# Altium PCB DT10966_MOTOR_CONTROLLER.PcbDoc (part 5 of 8)
Units mm, origin at the board's own origin, x right, y up, seen from the top; angles counter-clockwise.
Board outline 300 x 19 mm, 10 copper layers (Top Layer, Layer 2 GND, Layer 3 SIG, Layer 4 GND, Layer 5 PWR, Layer 6 PWR, Layer 7 GND, Layer 8 SIG, Layer 9 GND, Bottom Layer), stack 2.418 mm thick; 745 components, 446 nets, 2132 pads, 1222 vias.
Unrouted connection lines stored in the file: 3.
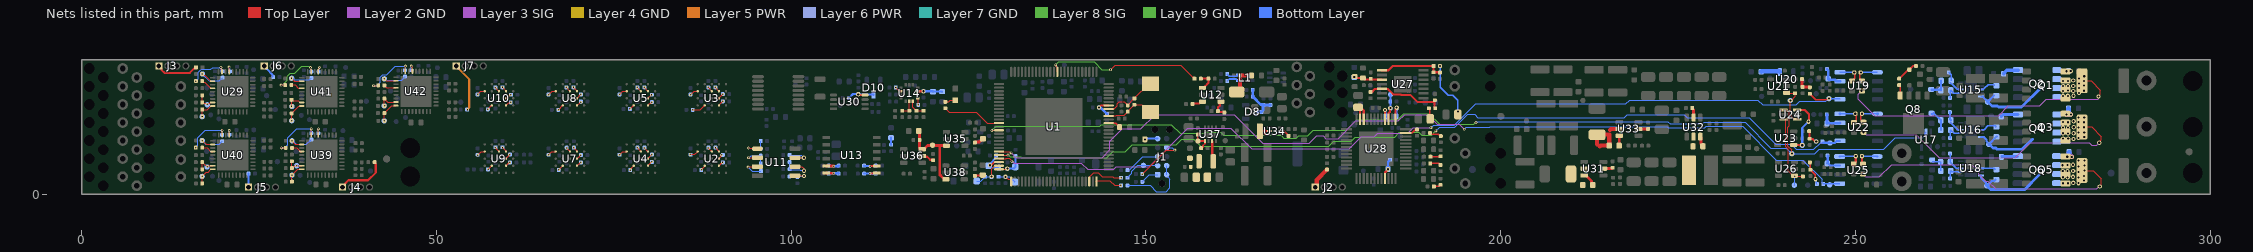
[diagram p12: the nets of this part, all layers, seen from the top]

## Via types
v1: diameter 0.6, hole 0.3, Top Layer to Bottom Layer, tented both sides, 726 vias
v2: diameter 0.4, hole 0.2, Top Layer to Bottom Layer, tented both sides, 493 vias
v3: diameter 0.5, hole 0.2, Top Layer to Bottom Layer, tented both sides, 3 vias

## Nets (pads, with @x,y where several pads share a name; then routed paths per layer and width w, separated by ;. In a path a pad name is that pad's centre, name@x,y a point inside that pad or via, vN(x,y) a via of type N, cw(c..) or ccw(c..) an arc to the next point about the centre after c; other vN are vias at no path point) (continued)
I_COMP: TP17.1 U1.14 U17.2 U24.4 | length 146.6
  Top Layer w0.15: v2(128.285,9.016) 128.295,9.027 129.276,9.027 U1.14@129.286,9.037 ; U24.4@239.843,11.889 240.243,11.889 240.657,11.475 240.657,9.674 240.445,9.462 240.445,6.801 240.98,6.266 240.98,5.774 v1(241.013,5.741)
  Layer 8 SIG w0.15: v2(128.285,9.016) 128.882,9.613 143.474,9.613 143.685,9.825 153.576,9.825 154.802,8.598 158.217,8.598 158.35,8.731 160.518,8.731 160.941,8.308 169.034,8.308 169.423,7.919 171.152,7.919 171.519,8.285 172.794,8.285 173.576,9.067 178.276,9.067 179.73,10.522 185.505,10.522 186.336,11.353 189.863,11.353 191.359,9.857 196.178,9.857 196.451,10.13 v2(196.506,10.13)
  Bottom Layer w0.15: v2(196.506,10.13) 196.573,10.13 196.701,10.257 223.51,10.257 223.844,9.923 228.49,9.923 228.699,10.133 234.435,10.133 238.068,6.501 240.253,6.501 v1(241.013,5.741) ; TP17.1@241.021,5.733 244.271,5.733 244.894,6.356 253.965,6.356 255.607,7.997 259.458,7.997 259.804,8.344 259.804,8.67 U17.2@259.929,8.795
I_COMP_A: R141.2 TP14.1 U21.1 U24.1 | length 5.9
  Top Layer w0.15: U21.1@240.274,14.303 240.299,14.278 241.445,14.278 R141.2@241.471,14.252 241.471,13.795 240.898,13.223 v1(240.796,13.223) 240.776,13.203 240.776,11.758 240.941,11.594 240.941,10.991 241.343,10.589 U24.1@241.743,10.589
I_COMP_B: R148.2 TP16.1 U23.1 U24.3 | length 7.9
  Top Layer w0.3: U23.1@241.275,6.969 241.278,6.966 242.469,6.966 R148.2@242.472,6.963 ; U24.3@241.743,11.889 242.84,11.889 243.438,11.291 243.438,10.418 243.345,10.325 v1(243.345,10.244)
  Bottom Layer w0.3: v1(242.472,6.913) 242.472,9.371 v1(243.345,10.244)
I_COMP_C: R156.2 TP20.1 U24.6 U26.1 | length 11.4
  Top Layer w0.15: U24.6@239.843,10.589 240.052,10.589 240.168,10.473 240.168,6.686 240.511,6.343 240.511,3.294 241.166,2.639 U26.1@241.366,2.639 v2(241.424,2.581) 242.504,2.581 R156.2@242.563,2.523
  Bottom Layer w0.15: TP20.1@241.366,1.296 241.395,1.325 241.395,2.552 v2(241.424,2.581)
IA: R146.1 TP10.1 U1.22 U19.5 | length 129.4
  Top Layer w0.15: U1.22@129.286,5.037 130.29,5.037 130.317,5.064 130.741,5.064 131.1,4.705 v2(131.1,4.654)
  Top Layer w0.2: R146.1@243.544,14.185 243.549,14.185 244.368,13.365 245.919,13.365 245.971,13.417 246.16,13.417 v1(246.236,13.494)
  Layer 3 SIG w0.127: v2(131.1,4.654) 131.153,4.654 131.403,4.404 140.909,4.404 141.776,3.537 145.461,3.537 145.827,3.903 150.44,3.903 155.87,9.333 161.971,9.333 164.888,6.416 178.614,6.416 180.317,8.119 182.134,8.119 182.64,8.624 186.898,8.624 187.658,9.384 v2(190.14,9.384)
  Bottom Layer w0.15: v2(190.14,9.384) 190.531,9.775 193.464,9.775 196.44,12.751 217.62,12.751 218.147,13.277 236.229,13.277 236.902,12.604 241.608,12.604 242.104,13.1 245.782,13.1 246.175,13.494 v1(246.236,13.494)
  Bottom Layer w0.2: v1(246.236,13.494) 246.285,13.445 247.738,13.445 U19.5@247.786,13.397
IB: R152.1 TP15.1 U1.21 U22.5 | length 125.1
  Top Layer w0.15: U1.21@129.286,5.537 v2(130.556,5.537)
  Layer 8 SIG w0.127: v2(130.556,5.537) 130.63,5.537 130.868,5.298 132.333,5.298 132.45,5.181 143.435,5.181 143.442,5.189 144.501,5.189 145.34,6.028 147.07,6.028 148.053,7.01 154.293,7.01 155.031,7.749 156.731,7.749 157.698,6.783 175.729,6.783 176.455,7.508 178.937,7.508 179.504,8.075 185.02,8.075 185.693,8.747 188.455,8.747 188.889,8.314 190.234,8.314 v2(190.858,8.937)
  Bottom Layer w0.127: v2(190.858,8.937) 191.361,9.44 193.504,9.44 195.327,11.262 196.311,11.262 196.764,10.809 217.402,10.809 217.786,11.193 225.88,11.193 226.278,10.795 234.372,10.795 234.387,10.81 235,10.81 238.767,7.043 240.943,7.043 241.639,6.348 244.118,6.348 245.05,7.279 245.392,7.279 R152.1@245.394,7.278
  Bottom Layer w0.3: R152.1@245.394,7.278 TP15.1@246.279,7.278 ; TP15.1@246.377,7.227 247.033,7.227 247.339,7.533 U22.5@247.799,7.533
IC: R159.1 TP19.1 U1.20 U25.5 | length 130.5
  Top Layer w0.127: U1.20@129.286,6.037 130.715,6.037 130.915,5.837 v2(130.989,5.837)
  Layer 3 SIG w0.127: v2(130.989,5.837) 131.677,5.149 142.872,5.149 142.883,5.159 143.815,5.159 144.918,6.263 144.918,7.481 146.656,9.219 149.268,9.219 151.28,11.231 162.429,11.231 166.421,7.239 173.035,7.239 174.046,8.251 174.953,8.251 175.362,7.841 177.066,7.841 179.567,10.342 185.571,10.342 186.477,11.248 189.697,11.248 191.044,9.901 194.13,9.901 v2(194.847,9.184)
  Bottom Layer w0.127: v2(194.847,9.184) 194.874,9.184 195.154,9.465 198.456,9.465 198.523,9.531 223.469,9.531 223.619,9.381 228.714,9.381 228.924,9.59 234.058,9.59 238.809,4.839 242.538,4.839 245.271,2.106 245.271,1.669 245.449,1.491 R159.1@245.47,1.491
  Bottom Layer w0.2: R159.1@245.437,1.458 245.47,1.491 246.396,1.491 247.723,1.491 U25.5@247.756,1.524
LED_Stat: R291.2 U1.12 | length 8.4
  Top Layer w0.15: R291.2@121.714,12.13 122.265,11.579 126.066,11.579 127.608,10.037 U1.12@129.286,10.037
NetC1_1: C1.1 R2.1 U1.66 Y1.1 | length 7
  Top Layer w0.127: U1.66@144.736,11.037 144.765,11.066 145.802,11.066 145.91,11.175 146.801,11.175 146.803,11.177 146.96,11.177 147.422,11.639 147.422,11.659 147.422,11.688 148.357,12.623 R2.1@148.357,12.627 149.397,12.627 150.437,11.587 Y1.1@150.637,11.587
NetC2_1: C2.1 R2.2 U1.68 Y1.2 | length 7.9
  Top Layer w0.127: U1.68@144.736,12.037 144.758,12.059 145.519,12.059 145.96,12.5 145.96,12.788 146.197,13.024 146.93,13.024 C2.1@147.422,12.533 ; C2.1@147.422,12.575 148.357,13.51 R2.2@148.357,13.527 148.377,13.527 150.437,15.587 Y1.2@150.637,15.587
NetC3_2: C3.2 R5.2 U1.69 | length 3
  Top Layer w0.3: v1(143.377,12.253) 143.406,12.253 143.691,12.537 U1.69@144.736,12.537
  Bottom Layer w0.4: v1(143.377,12.253) 143.377,12.233 143.437,12.173 143.669,12.173 144.424,11.417 144.424,11.412 144.499,11.337 R5.2@144.504,11.337 ; C3.2@143.389,12.221 C3.2@143.389,12.253
NetC4_2: C4.2 D1.2 R216.2 U1.25 | length 3.7
  Top Layer w0.15: U1.25@129.286,3.537 129.315,3.566 130.408,3.566 v1(130.464,3.622)
  Bottom Layer w0.3: v1(130.464,3.622) 131.326,3.622 131.635,3.931 R216.2@131.635,5.148
NetC5_2: C5.2 D2.2 R241.2 U1.24 | length 4.6
  Top Layer w0.15: v1(128.249,2.516) 128.249,3.618 128.594,3.962 128.595,3.962 128.67,4.037 U1.24@129.286,4.037
  Bottom Layer w0.15: D2.2@126.157,1.878 126.745,1.878 C5.2@127.334,2.467 ; C5.2@127.334,2.467 R241.2@128.249,2.466
NetC6_2: C6.2 D3.2 R275.2 U1.23 | length 4.8
  Top Layer w0.2: v1(128.026,4.105) 128.103,4.181 128.259,4.181 128.597,4.518 129.267,4.518 U1.23@129.286,4.537
  Bottom Layer w0.2: R275.2@128.904,5.499 R275.2@128.896,5.492 128.787,5.382 128.787,5.102 128.169,4.485 128.169,4.469 128.026,4.326 v1(128.026,4.105) 128.026,3.873 128.16,3.739 129.144,3.739 C6.2@129.286,3.597
NetC7_2: C7.2 D4.2 R277.2 U1.26 | length 3.8
  Top Layer w0.15: v1(130.2,2.469) 130.571,2.098 130.942,2.098 131.011,2.029 U1.26@131.011,1.812
  Bottom Layer w0.15: R277.2@129.207,2.477 129.211,2.473 130.196,2.473 v1(130.2,2.469) 130.795,2.469 131.511,1.753 D4.2@131.511,1.728
NetC64_2: C64.2 U14.8 | length 1
  Top Layer w0.15: U14.8@117.821,13.535 117.901,13.455 v2(117.901,12.612)
NetC65_2: C65.2 C66.2 FB10.1 U14.10 | length 3.5
  Top Layer w0.3: U14.10@117.821,14.535 117.825,14.531 118.647,14.531 v1(118.651,14.527)
  Bottom Layer w0.3: v1(118.651,14.527) 118.661,14.537 C66.2@119.967,14.537 ; C66.2@119.967,14.469 119.994,14.469 120.032,14.507 121.237,14.507 FB10.1@121.275,14.469
NetC70_1: C70.1 Q1.1 Q1.2 Q1.3 Q2.5 Q2.6 Q2.7 Q2.8 R129.1 R135.2 TP4.1 U15.5 | length 53.2
  Top Layer w0.15: R129.1@281.906,16.006 283.168,16.006 284.485,14.69 284.485,14.393 284.477,14.386 284.477,14.12 284.217,13.859 v1(284.217,13.807)
  Layer 3 SIG w0.15: v1(250.843,14.594) 250.378,14.128 250.378,13.378 252.661,11.095 270.156,11.095 271.526,12.466 275.979,12.466 276.895,13.382 284.114,13.382 284.228,13.495 284.228,13.796 v1(284.217,13.807)
  Bottom Layer w0.2: U15.5@267.65,13.774 U15.5@267.929,13.774
  Bottom Layer w0.3: U15.5@267.929,13.774 268.59,13.113 TP4.1@268.59,13.017 ; TP4.1@268.59,12.996 TP4.1@268.59,13.017 ; C70.1@269.512,13.91 269.483,13.91 TP4.1@268.59,13.017
  Bottom Layer w0.4: TP4.1@268.59,12.996 268.676,12.996 269.206,12.466 269.957,12.466 270.133,12.29 273.366,12.29 276.074,14.998
  other v1: 279.232,13.885 279.903,13.887 280.685,13.896 281.459,14.292 280.668,14.572 279.238,14.589 282.179,14.6 279.903,14.632 281.489,14.977 279.241,15.259 280.657,15.27 279.909,15.285 282.187,15.321 281.467,15.647 279.219,15.977 279.901,15.982 282.187,15.999 280.657,16.03 281.482,16.309 282.222,16.639
NetC70_2: C70.2 U15.3 | length 2.3
  Bottom Layer w0.2: U15.3@267.65,14.774 267.677,14.801 268.028,14.801 268.147,14.92 268.15,14.92 268.663,15.433 269.499,15.433 269.512,15.42 C70.2@269.512,15.31
NetC71_1: C71.1 C72.1 R77.1 | length 2.7
  Bottom Layer w0.3: R77.1@260.701,14.75 261.927,14.75 C72.1@262.008,14.67 262.025,14.687 262.025,15.99 C71.1@262.042,16.007
NetC71_2: C71.2 R117.2 U15.8 | length 3.3
  Bottom Layer w0.2: R117.2@263.12,17.204 263.442,16.883 C71.2@263.442,16.007 ; C71.2@263.362,15.798 263.317,15.753 263.473,15.596 263.544,15.596 264.339,14.801 264.778,14.801 U15.8@264.805,14.774
NetC72_2: C72.2 R115.2 U15.7 | length 2.7
  Bottom Layer w0.2: R115.2@263.31,13.525 263.359,13.573 263.359,14.621 C72.2@263.408,14.67 263.803,14.274 U15.7@264.805,14.274
NetC77_1: C77.1 Q3.1 Q3.2 Q3.3 Q4.5 Q4.6 Q4.7 Q4.8 R139.1 R144.2 TP5.1 U16.5 | length 50.5
  Top Layer w0.15: R139.1@281.906,9.506 283.253,9.506 284.634,8.125 284.634,7.713 284.326,7.405 v1(284.326,7.283)
  Layer 3 SIG w0.15: v1(251.13,8.747) 251.496,8.38 258.536,8.38 261.766,5.15 272.458,5.15 274.591,7.283 282.924,7.283 283.272,6.935 283.978,6.935 v1(284.326,7.283)
  Bottom Layer w0.3: U16.5@267.65,8.102 267.673,8.079 268.051,8.079 268.442,7.688 268.442,7.473 268.762,7.152 TP5.1@268.762,7.031 C77.1@269.902,8.171
  Bottom Layer w0.4: TP5.1@268.762,7.031 268.848,7.031 269.354,6.524 269.781,6.524 269.958,6.348 273.475,6.348 273.548,6.42 273.557,6.42 274.9,7.764
  other v1: 280.699,7.81 279.962,7.851 279.244,7.856 281.421,7.944 282.22,8.092 279.235,8.615 279.935,8.595 280.723,8.611 281.405,8.697 282.213,8.727 279.235,9.418 279.935,9.405 281.405,9.412 282.19,9.453 280.732,9.462 282.183,10.163 279.929,10.167 279.217,10.195 281.405,10.192 280.722,10.303 282.22,10.852 281.405,10.857
NetC77_2: C77.2 U16.3 | length 2.5
  Bottom Layer w0.2: U16.3@267.65,9.102 267.677,9.129 268.096,9.129 268.604,9.637 269.684,9.637 C77.2@269.827,9.494
NetC78_1: C78.1 C79.1 R286.1 | length 2.9
  Bottom Layer w0.3: R286.1@260.711,11.318 R286.1@260.787,11.242 ; R286.1@261.004,11.456 261.733,10.727 261.76,10.727 262.018,10.469 C78.1@262.018,10.442 ; C79.1@262.008,9.06 262.013,9.065 C78.1@262.013,10.437
NetC78_2: C78.2 R122.2 U16.8 | length 3.1
  Bottom Layer w0.2: C78.2@263.325,10.181 264.378,9.129 264.778,9.129 U16.8@264.805,9.102
  Bottom Layer w0.3: R122.2@263.272,11.585 263.298,11.56 263.298,10.562 C78.2@263.418,10.442
NetC79_2: C79.2 R120.2 U16.7 | length 2.8
  Bottom Layer w0.2: R120.2@263.301,7.925 263.354,7.978 263.354,9.006 C79.2@263.408,9.06 263.865,8.602 U16.7@264.805,8.602
NetC85_1: C85.1 Q5.1 Q5.2 Q5.3 Q6.5 Q6.6 Q6.7 Q6.8 R149.1 R155.2 TP7.1 U18.5 | length 52.5
  Top Layer w0.15: R149.1@281.906,3.364 R149.1@282.214,3.364 ; v1(282.228,3.349) R149.1@282.214,3.364 ; v1(284.392,1.112) 284.392,1.185 284.631,1.425 284.631,2.205 283.472,3.364 R149.1@282.214,3.364
  Layer 3 SIG w0.15: v1(251.031,2.877) 251.453,2.454 253.355,2.454 255.08,4.178 266.339,4.178 267.328,3.19 267.328,2.855 268.316,1.866 268.651,1.866 269.71,0.808 284,0.808 284.304,1.112 v1(284.392,1.112)
  Bottom Layer w0.3: U18.5@267.65,2.643 267.65,2.351 268.389,1.612 268.389,1.294 TP7.1@268.475,1.207 268.51,1.207 269.176,1.873 269.545,1.873 269.689,2.017 C85.1@269.689,2.06 ; 275.855,2.733 275.855,3.114
  Bottom Layer w0.4: TP7.1@268.503,1.207 269.01,0.701 273.823,0.701 275.855,2.733
  other v1: 279.224,1.563 279.908,1.56 281.406,1.576 280.663,1.621 282.19,1.937 281.405,2.365 279.203,2.404 279.878,2.403 280.643,2.465 282.205,2.594 281.405,3.169 279.176,3.291 279.849,3.296 280.65,3.295 281.405,3.953 282.228,4.09 279.163,4.105 279.839,4.13 280.643,4.172 281.405,4.776 282.225,4.756
NetC85_2: C85.2 U18.3 | length 2.1
  Bottom Layer w0.2: U18.3@267.65,3.666 267.665,3.651 269.499,3.651 C85.2@269.689,3.461
NetC86_1: C86.1 C87.1 R287.1 | length 2.5
  Bottom Layer w0.2: R287.1@260.782,4.571 C86.1@261.952,4.571 ; C86.1@261.961,4.58 261.985,4.557 261.985,3.332 C87.1@262.008,3.309
NetC86_2: C86.2 R127.2 U18.8 | length 3
  Bottom Layer w0.2: R127.2@263.301,5.741 263.331,5.711 263.331,4.61 C86.2@263.361,4.58 263.361,4.53 264.198,3.693 264.778,3.693 U18.8@264.805,3.666
NetC87_2: C87.2 R125.2 U18.7 | length 2.6
  Bottom Layer w0.2: R125.2@263.319,2.234 263.364,2.278 263.364,3.265 C87.2@263.408,3.309 263.55,3.166 U18.7@264.805,3.166
NetC91_1: C91.1 R135.1 U19.1 | length 3.8
  Top Layer w0.2: v1(250.747,17.172) 250.736,17.172 250.558,16.995 250.558,16.369 250.601,16.326 250.601,16.295 250.904,15.992 R135.1@250.916,15.992
  Bottom Layer w0.2: v1(250.747,17.172) 250.765,17.189 253.049,17.189 U19.1@253.066,17.207
NetC91_2: C91.2 R134.1 U19.8 | length 3.4
  Top Layer w0.2: R134.1@249.494,15.985 249.505,15.985 249.878,16.358 249.878,17.102 v1(249.807,17.172)
  Bottom Layer w0.2: U19.8@247.786,17.207 247.804,17.189 249.79,17.189 v1(249.807,17.172)
NetC93_2: C93.2 R136.2 U19.7 | length 3.3
  Bottom Layer w0.4: C93.2@245.952,17.676 245.952,17.656 246.134,17.474 R136.2@246.134,16.297 246.271,16.16 247.108,16.16 247.331,15.937 U19.7@247.786,15.937
NetC94_2: C94.2 FB11.2 U20.1 | length 2.7
  Bottom Layer w0.6: FB11.2@236.694,17.281 236.694,17.3 236.754,17.36 C94.2@237.918,17.36 ; C94.2@237.941,17.363 239.221,17.363 239.321,17.263 U20.1@239.321,17.233
NetC98_1: C98.1 R144.1 U22.1 | length 3.6
  Top Layer w0.2: v1(250.886,11.366) 250.747,11.227 250.747,10.539 250.815,10.472 250.815,10.46 251.118,10.157 R144.1@251.13,10.157
  Bottom Layer w0.2: v1@250.898,11.354 U22.1@253.068,11.354
  Bottom Layer w0.4: v1(250.886,11.366) v1@250.898,11.354 ; U22.1@253.068,11.354 U22.1@253.079,11.343
NetC98_2: C98.2 R143.1 U22.8 | length 3.6
  Top Layer w0.2: R143.1@249.782,10.137 249.794,10.137 250.097,10.441 250.097,10.499 250.113,10.515 250.113,11.199 v1(249.946,11.366)
  Bottom Layer w0.2: U22.8@247.811,11.354 v1@249.935,11.354
  Bottom Layer w0.4: U22.8@247.799,11.343 U22.8@247.811,11.354 ; v1@249.935,11.354 v1(249.946,11.366)
NetC100_2: C100.2 R145.1 R146.2 | length 2.2
  Top Layer w0.4: R145.1@242.448,16.243 242.448,15.194 242.508,15.133 C100.2@242.528,15.133 242.553,15.109 243.52,15.109 R146.2@243.544,15.085
NetC102_2: C102.2 R147.2 U22.7 | length 3.2
  Bottom Layer w0.4: C102.2@245.936,11.269 245.952,11.253 245.952,10.01 R147.2@245.969,9.993 246.008,10.033 247.76,10.033 U22.7@247.799,10.073
NetC105_2: C105.2 R151.1 R152.2 | length 2.1
  Top Layer w0.3: R151.1@243.45,8.898 243.49,8.858 243.49,7.882 243.592,7.78 243.967,7.78 v1@244.342,7.405
  other v1: 244.457,7.444
NetC107_1: C107.1 R155.1 U25.1 | length 3.3
  Top Layer w0.3: v1(250.889,5.382) 250.889,4.428 R155.1@251.043,4.274
  Bottom Layer w0.2: v1@250.913,5.358 U25.1@253.012,5.358
  Bottom Layer w0.3: v1(250.889,5.382) v1@250.913,5.358 ; U25.1@253.012,5.358 U25.1@253.036,5.334
NetC107_2: C107.2 R154.1 U25.8 | length 3.5
  Top Layer w0.3: R154.1@249.729,4.295 249.767,4.295 250.009,4.536 v1(250.009,5.382)
  Bottom Layer w0.2: U25.8@247.781,5.358 v1@249.985,5.358
  Bottom Layer w0.3: U25.8@247.756,5.334 U25.8@247.781,5.358 ; v1@249.985,5.358 v1(250.009,5.382)
NetC109_2: C109.2 R157.2 U25.7 | length 3
  Bottom Layer w0.3: R157.2@246.005,4.377 246.073,4.445 246.073,5.444 C109.2@246.043,5.475 ; R157.2@246.057,4.418 246.412,4.064 U25.7@247.756,4.064
NetC111_2: C111.2 R158.1 R159.2 | length 3.5
  Top Layer w0.2: R158.1@243.541,4.501 243.581,4.462 243.581,3.504 C111.2@243.62,3.465 243.624,3.465 244.34,2.749 v1(244.34,2.147)
  Bottom Layer w0.2: v1(244.34,2.147) 244.416,2.071 244.416,1.578 R159.2@244.537,1.458
NetC112_2: C112.2 R161.1 R162.2 U27.1 | length 9.4
  Top Layer w0.3: U27.1@183.222,17.47 183.25,17.498 184.17,17.498 184.758,18.086 R162.2@190.532,18.086 ; C112.2@190.517,17.202 190.525,17.209 190.525,18.078 R162.2@190.532,18.086 ; C112.2@190.525,17.21 191.413,17.21 R161.1@191.421,17.218 ; R162.2@190.529,18.088 R162.2@190.532,18.086
NetC114_1: C114.1 R162.1 | length 8
  Top Layer w0.2: v1(191.432,18.086) R162.1@191.58,18.234
  Bottom Layer w0.2: v1(191.432,18.086) 191.432,15.123 192.6,13.956 193.253,13.956 193.952,13.257 193.952,11.693 v1(193.94,11.681)
NetC115_1: C115.1 R164.1 | length 1.6
  Top Layer w0.2: R164.1@189.857,12.134 189.956,12.035 189.956,10.74 C115.1@190.056,10.64
NetC116_2: C116.2 R163.1 U28.45 | length 3
  Top Layer w0.3: U28.45@183.682,2.25 183.682,3.076 184.106,3.5 v1(184.106,3.542)
  Bottom Layer w0.3: R163.1@184.106,3.488 v1(184.106,3.542) R163.1@184.106,3.559 184.106,4.57 184.394,4.858 C116.2@184.394,4.878
NetC120_1: C120.1 U28.16 | length 2.3
  Top Layer w0.3: U28.16@183.682,10.59 183.682,11.898 v1(183.685,11.901)
  Bottom Layer w0.3: v1(183.685,11.901) 183.742,11.844 183.742,11.031 C120.1@183.831,10.943
NetC120_2: C120.2 R165.1 U28.13 | length 3
  Top Layer w0.3: U28.13@185.182,10.59 185.182,12.003 185.318,12.139 v1(185.318,12.22)
  Bottom Layer w0.3: C120.2@185.231,10.943 185.283,10.995 185.283,12.072 R165.1@185.335,12.124 185.318,12.141 v1(185.318,12.22)
NetC121_2: C121.2 R165.2 TP23.1 U28.15 | length 3.7
  Top Layer w0.3: U28.15@184.182,10.59 184.182,11.416 184.378,11.612 184.378,12.106 v1(184.435,12.163)
  Bottom Layer w0.3: v1(184.435,12.163) R165.2@184.435,12.124 C121.2@184.435,13.092 ; C121.2@184.435,13.092 184.45,13.107 184.45,14.059 TP23.1@184.465,14.074
NetC122_1: C122.1 R166.1 R169.1 R170.2 U27.3 | length 4
  Top Layer w0.3: v1(179.345,16.564) 179.525,16.384 180.641,16.384 180.856,16.17 181.67,16.17 U27.3@183.222,16.17
NetC123_2: C123.2 R164.2 R167.1 U27.5 | length 11.2
  Top Layer w0.3: R167.1@181.772,14.362 182.28,14.87 U27.5@183.222,14.87 183.25,14.842 184.072,14.842 184.829,14.086 185.856,14.086 185.92,14.022 187.243,14.022 188.236,13.029 190.46,13.029 190.687,13.256 C123.2@190.707,13.256 190.633,13.182 190.633,12.258 R164.2@190.757,12.134
NetC125_1: C125.1 U28.22 U28.23 | length 4.5
  Top Layer w0.3: C125.1@180.089,12.629 180.229,12.489 180.229,12.278 C125.1@180.55,11.956 ; U28.23@180.182,10.59 C125.1@180.182,11.844 ; C125.1@180.182,12.419 180.182,11.956 C125.1@180.182,11.844 ; U28.22@180.682,10.59 180.682,11.825 C125.1@180.55,11.956 ; C125.1@180.182,11.844 180.294,11.956 C125.1@180.55,11.956
NetC126_2: C126.2 U28.11 | length 1.8
  Top Layer w0.2: U28.11@186.602,8.67 186.629,8.697 187.534,8.697 187.842,9.005 188.065,9.005 C126.2@188.198,9.137
NetC127_1: C127.1 R177.1 | length 1
  Top Layer w0.2: R177.1@190.585,1.17 191.305,1.17 191.472,1.338 C127.1@191.509,1.338
NetC128_1: C128.1 R179.1 | length 1.5
  Top Layer w0.2: R179.1@190.058,4.354 191.264,4.354 191.472,4.145 C128.1@191.509,4.145
NetC138_1: C138.1 R184.1 | length 1.5
  Top Layer w0.15: R184.1@190.042,5.216 R184.1@190.111,5.285 ; C138.1@191.444,5.285 C138.1@191.513,5.354
  Top Layer w0.2: R184.1@190.111,5.285 C138.1@191.444,5.285
NetC139_1: C139.1 R185.1 | length 1.6
  Top Layer w0.2: R185.1@190.014,8.506 191.218,8.506 191.504,8.219 C139.1@191.54,8.219
NetC141_2: C141.2 R190.2 TP31.1 U29.18 | length 2.7
  Top Layer w0.15: C141.2@17,10.958 17.005,10.963 R190.2@17.005,11.953 ; R190.2@17.01,11.958 17.699,11.958 18.19,12.449 U29.18@18.47,12.449
  other v2: 16.988,10.969
NetC142_2: C142.2 R192.2 TP32.1 U29.17 | length 2.7
  Top Layer w0.15: R192.2@17.01,13.958 17.005,13.953 17.005,12.963 C142.2@17,12.958 17.113,12.844 17.485,12.844 17.63,12.698 v2(17.698,12.698) 17.746,12.746 17.988,12.746 18.19,12.949 U29.17@18.47,12.949
NetC143_1: C143.1 U29.13 | length 1.9
  Top Layer w0.15: C143.1@17,15.958 17.171,15.787 17.392,15.787 18.23,14.949 U29.13@18.47,14.949
NetC143_2: C143.2 R196.1 U29.8 | length 6.1
  Top Layer w0.15: v2(19.642,17.877) 19.689,17.83 19.689,17.658 19.795,17.553 U29.8@19.795,17.274
  Bottom Layer w0.15: v2(16.12,15.958) 16.464,16.302 16.464,17.197 16.802,17.535 16.825,17.535 16.918,17.627 18.222,17.627 18.472,17.877 v2(19.642,17.877) 19.642,17.81 19.721,17.73 19.721,17.514 R196.1@19.888,17.347
NetC144_2: C144.2 R196.2 TP35.1 U29.11 | length 5.4
  Top Layer w0.15: v2(17,16.958) 17.171,16.787 17.377,16.787 18.215,15.949 U29.11@18.47,15.949
  Bottom Layer w0.15: v2(17,16.958) TP35.1@17.041,16.958 18.004,15.995 19.436,15.995 R196.2@19.888,16.447
NetC145_2: C145.2 U29.6 | length 1.3
  Top Layer w0.15: U29.6@20.795,17.274 v2(20.795,17.936)
  Bottom Layer w0.15: v2(20.795,17.936) 20.795,17.868 20.903,17.76 C145.2@20.903,17.327
NetC151_2: C151.2 D10.3 R198.2 U30.8 | length 4.7
  Top Layer w0.3: v1(109.456,14.097) 109.537,14.097 109.61,14.024 110.397,14.024 U30.8@110.413,14.009
  Bottom Layer w0.3: R198.2@108.138,13.572 108.138,13.577 108.263,13.702 108.268,13.702 108.707,14.142 109.412,14.142 v1(109.456,14.097) 109.465,14.088 111.552,14.088 D10.3@111.605,14.035
NetC155_2: C155.2 D5.2 FB14.2 | length 4.2
  Top Layer w0.6: D5.2@162.79,14.425 163.23,14.865 C155.2@163.23,16.773 163.254,16.749 FB14.2@164.88,16.749
NetC156_2: C156.2 D8.3 R204.1 R205.1 R206.2 | length 5.3
  Bottom Layer w0.4: R206.2@165.049,14.727 165.053,14.724 165.053,13.769 C156.2@165.056,13.766 165.056,13.746 165.116,13.686 165.136,13.686 166.135,12.687 166.474,12.687 R205.1@166.549,12.612 ; D8.3@166.043,11.612 166.293,11.612 166.504,11.824 166.504,12.568 R205.1@166.549,12.612 ; R204.1@167.543,12.612 R205.1@166.549,12.612
NetC159_1: C159.1 L2.1 U31.5
NetC159_2: C159.2 U31.6 | length 2
  Top Layer w0.4: U31.6@211.752,2.674 212.002,2.674 212.777,1.898 212.777,1.503 C159.2@212.962,1.318
NetC160_1: C160.1 L3.1 U32.5
NetC160_2: C160.2 U32.6 | length 1.5
  Top Layer w0.4: U32.6@228.115,8.137 228.215,8.037 228.215,7.087 228.479,6.823 C160.2@228.479,6.773
NetC173_1: C173.1 L4.1 U33.5 | length 7.4
  Top Layer w0.6: 213.562,7.053 L4.1@213.562,8.393 213.619,8.451 215.323,8.451 215.265,8.393 C173.1@215.265,6.873 214.015,6.873 213.941,6.799 ; 215.392,9.083 215.523,9.214 U33.5@216.698,9.214
NetC173_2: C173.2 U33.6 | length 1.4
  Top Layer w0.4: C173.2@216.665,6.873 216.681,6.889 216.681,8.247 U33.6@216.698,8.264
NetC188_2: C188.2 R224.1 | length 1.3
  Top Layer w0.4: R224.1@125.896,7.302 125.971,7.377 126.506,7.377 126.97,7.841 C188.2@127.02,7.841
NetC193_2: C193.2 C194.2 C195.2 FB15.1 L6.2 R222.2 R226.2 TP47.1 U37.5 | length 3.1
  Top Layer w0.25: R226.2@157.272,8.444 157.303,8.413 157.303,7.552 TP47.1@157.335,7.521 U37.5@158.335,7.521 U37.5@158.32,7.506 ; R222.2@157.885,6.521 158.027,6.663 158.027,6.882 158.32,7.175
  Top Layer w0.3: 158.32,7.175 U37.5@158.32,7.506
NetC197_2: C197.2 U36.5 | length 2
  Top Layer w0.15: C197.2@120.002,4.801 C197.2@120.064,4.864
  Top Layer w0.3: U36.5@118.459,5.409 118.559,5.308 119.156,5.308 119.582,4.882 120.051,4.882 C197.2@120.132,4.801
NetC198_2: C198.2 C199.2 TP46.1 U35.3 U36.6 U38.3 | length 11.9
  Top Layer w0.4: C199.2@117.979,8.923 118.098,8.803 C198.2@118.098,7.688 ; C198.2@118.098,7.668 118.098,6.719 118.109,6.709 118.109,6.459 118.209,6.359 U36.6@118.459,6.359 118.709,6.359 119.216,6.866 119.857,6.866 TP46.1@119.924,6.933 119.969,6.888 120.933,6.888 121.844,6.888 U35.3@121.888,6.843 ; 120.888,6.888 120.933,6.843 120.933,2.767 121.248,2.452 121.265,2.452 121.494,2.224 121.697,2.224 U38.3@121.802,2.119
NetC201_2: C201.2 R228.1 | length 1.2
  Top Layer w0.3: R228.1@125.889,2.602 125.951,2.664 126.938,2.664 C201.2@127,2.726
NetC203_2: C203.2 R232.2 TP52.1 U39.18 | length 2.7
  Top Layer w0.15: C203.2@29.653,1.781 29.646,1.788 29.646,2.695 v2(29.657,2.705) 29.65,2.712 R232.2@29.638,2.712 30.464,3.537 U39.18@31.037,3.537
NetC204_2: C204.2 R234.2 TP53.1 U39.17 | length 2.5
  Top Layer w0.15: R234.2@29.638,4.667 29.646,4.66 29.646,3.697 C204.2@29.653,3.69 29.663,3.69 30.011,4.037 U39.17@31.037,4.037
  other v2: 30.306,4.037
NetC205_1: C205.1 U39.13 | length 1.6
  Top Layer w0.15: C205.1@29.653,6.555 30.306,6.555 30.737,6.124 30.737,6.107 30.806,6.037 U39.13@31.037,6.037
NetC205_2: C205.2 R238.1 U39.8 | length 7.9
  Top Layer w0.15: v2(28.166,6.541) 28.173,6.548 28.767,6.548 C205.2@28.773,6.555 ; U39.8@32.362,8.362 v2(32.362,9.229)
  Bottom Layer w0.15: v2(28.166,6.541) 28.568,6.541 29.054,7.026 29.054,7.959 30.324,9.229 v2(32.362,9.229) 32.371,9.22 32.371,8.639 R238.1@32.38,8.63
NetC206_2: C206.2 R238.2 TP56.1 U39.11 | length 4.8
  Top Layer w0.15: v2(29.653,7.555) 29.653,7.535 30.151,7.037 U39.11@31.037,7.037
  Bottom Layer w0.15: v2(29.653,7.555) 29.752,7.555 30.272,7.034 31.68,7.034 32.375,7.73 R238.2@32.38,7.73
NetC207_2: C207.2 U39.6 | length 1.5
  Top Layer w0.15: U39.6@33.362,8.362 33.371,8.371 33.371,9.221 v2(33.379,9.229)
  Bottom Layer w0.15: C207.2@33.369,8.626 33.374,8.631 33.374,9.224 v2(33.379,9.229)
NetC213_2: C213.2 R247.2 TP63.1 U40.18 | length 2.9
  Top Layer w0.15: C213.2@16.998,1.533 17.003,1.538 17.003,2.528 v2(17.008,2.533) 17.592,3.117 17.821,3.117 18.241,3.537 U40.18@18.496,3.537
NetC214_2: C214.2 R249.2 TP64.1 U40.17 | length 2.8
  Top Layer w0.15: R249.2@17.008,3.533 17.003,3.538 17.003,4.508 17.003,4.528 C214.2@16.998,4.533 16.998,4.527 17.574,3.951 17.667,3.951 v2(17.715,3.904) 17.782,3.904 17.916,4.037 U40.17@18.496,4.037
NetC215_1: C215.1 U40.13 | length 1.7
  Top Layer w0.15: C215.1@16.991,6.584 17.68,6.584 18.227,6.037 U40.13@18.496,6.037
NetC215_2: C215.2 R253.1 U40.8 | length 6.6
  Top Layer w0.15: v2(19.803,9.01) 19.812,9 19.812,8.372 U40.8@19.821,8.362
  Bottom Layer w0.15: v2(16.111,6.584) 16.111,6.605 16.401,6.895 16.401,7.984 17.431,9.014 19.798,9.014 19.809,9.004 19.809,8.39 R253.1@19.82,8.38
NetC216_2: C216.2 R253.2 TP67.1 U40.11 | length 5
  Top Layer w0.15: C216.2@16.996,7.573 v2(17.006,7.584) ; C216.2@16.996,7.589 17.001,7.584 17.004,7.581 17.547,7.037 U40.11@18.496,7.037
  Bottom Layer w0.15: v2(17.006,7.584) 17.006,7.578 17.53,7.055 19.39,7.055 19.815,7.48 R253.2@19.82,7.48
NetC217_2: C217.2 U40.6 | length 1
  Top Layer w0.15: U40.6@20.821,8.362 20.836,8.377 20.836,8.775
  Bottom Layer w0.15: v2(20.824,8.986) 20.836,8.975 20.836,8.426 C217.2@20.848,8.415
NetC223_2: C223.2 R257.2 TP73.1 U41.18 | length 2.9
  Top Layer w0.15: C223.2@29.59,10.43 29.596,10.436 29.596,11.421 30.609,12.434 31.022,12.434 U41.18@31.037,12.449
  other v2: 29.61,10.379
NetC224_2: C224.2 R259.2 TP74.1 U41.17 | length 2.5
  Top Layer w0.15: U41.17@31.037,12.949 30.758,12.949 30.535,13.172 29.746,13.172 R259.2@29.59,13.328 29.591,13.327 v2(29.591,12.414) ; v2(29.591,12.414) C224.2@29.593,12.412 v2(29.591,12.414)
NetC225_1: C225.1 U41.13 | length 1.7
  Top Layer w0.15: C225.1@29.578,15.458 29.602,15.434 30.082,15.434 30.567,14.949 U41.13@31.037,14.949
NetC225_2: C225.2 R263.1 U41.8 | length 7.6
  Top Layer w0.15: v2(28.123,15.4) 28.153,15.43 28.653,15.43 C225.2@28.689,15.467 ; v2(32.261,17.868) 32.309,17.82 32.309,17.606 32.362,17.553 U41.8@32.362,17.274
  Layer 8 SIG w0.15: v2(28.123,15.4) 28.16,15.437 28.387,15.437 29.017,16.068 29.017,16.636 29.436,17.055 30.034,17.055 31.057,18.077 32.048,18.077 32.257,17.868 v2(32.261,17.868) v2@32.309,17.82
  Bottom Layer w0.15: v2(32.261,17.868) 32.276,17.854 32.276,17.399 R263.1@32.381,17.294
NetC226_2: C226.2 R263.2 TP77.1 U41.11 | length 4.6
  Top Layer w0.15: C226.2@29.598,16.351 29.598,16.296 29.744,16.15 29.8,16.15 30.001,15.949 U41.11@31.037,15.949
  Bottom Layer w0.15: v2(29.585,16.351) 29.598,16.351 TP77.1@29.61,16.363 29.767,16.363 29.998,16.132 32.088,16.132 32.35,16.394 R263.2@32.381,16.394
NetC227_2: C227.2 U41.6 | length 1.2
  Top Layer w0.15: U41.6@33.362,17.274 33.362,17.553 33.497,17.688 33.497,17.842 v2(33.545,17.89)
  Bottom Layer w0.15: C227.2@33.41,17.484 33.494,17.484 33.497,17.487 33.497,17.842 v2(33.545,17.89)
NetC233_2: C233.2 R267.2 TP83.1 U42.18 | length 3.2
  Top Layer w0.15: v2(42.683,10.367) 42.675,10.374 42.675,11.441 R267.2@42.668,11.449 43.734,12.515 U42.18@44.305,12.515
NetC234_2: C234.2 R269.2 TP84.1 U42.17 | length 2.9
  Top Layer w0.15: R269.2@42.668,12.469 42.675,12.476 42.675,13.481 C234.2@42.683,13.488 42.683,13.468 43.136,13.015 U42.17@44.305,13.015
  other v2: 42.718,12.469
NetC235_1: C235.1 U42.13 | length 1.7
  Top Layer w0.15: C235.1@42.683,15.32 42.693,15.32 42.998,15.015 U42.13@44.305,15.015
NetC235_2: C235.2 R273.1 U42.8 | length 7.8
  Top Layer w0.15: v2(41.165,15.295) 41.177,15.307 41.79,15.307 C235.2@41.803,15.32 ; U42.8@45.63,17.34 45.633,17.342 45.633,18.069 v2(45.635,18.072)
  Bottom Layer w0.15: v2(41.165,15.295) 41.586,15.295 42.085,15.794 42.085,15.926 42.093,15.934 42.093,16.514 42.431,16.852 43.01,16.852 44.23,18.072 v2(45.635,18.072) ; R273.1@45.583,17.487 45.633,17.536 45.633,17.862
NetC236_2: C236.2 R273.2 TP87.1 U42.11 | length 4.9
  Top Layer w0.15: v2(42.67,16.275) 42.68,16.275 42.94,16.015 U42.11@44.305,16.015
  Bottom Layer w0.15: v2(42.67,16.275) 42.832,16.275 42.994,16.113 45.105,16.113 45.578,16.587 R273.2@45.583,16.587
NetC237_2: C237.2 U42.6 | length 1.4
  Top Layer w0.15: v2(46.462,18.066) 46.462,18.031 46.63,17.863 U42.6@46.63,17.34
  Bottom Layer w0.15: v2(46.462,18.066) 46.464,18.064 46.464,17.487 C237.2@46.466,17.485
NetD7_2: D7.2 R208.1 R209.2 | length 3.2
  Top Layer w0.2: R208.1@256.141,16.301 256.146,16.301 257.243,17.398 257.399,17.398 257.968,17.967 258.114,18.113 258.563,18.113 R209.2@258.572,18.122
NetD9_1: D9.1 R291.1 | length 1.5
  Top Layer w0.15: R291.1@121.714,13.03 121.767,13.083 122.219,13.083 122.399,13.262 D9.1@123.137,13.262
NetFB4_2: FB4.2 J1.5 | length 1.8
  Bottom Layer w0.3: v1(149.843,7.755) 149.924,7.755 150.026,7.857 J1.5@151.637,7.857
NetFB8_2: FB8.2 R95.1 | length 1
  Bottom Layer w0.3: R95.1@114.092,6.999 FB8.2@114.092,7.975
NetJ1_1: J1.1 R294.1 | length 2.6
  Bottom Layer w0.15: R294.1@149.478,1.774 150.482,2.777 J1.1@151.637,2.777
NetJ1_2: J1.2 R3.1 TP3.1 | length 4.8
  Bottom Layer w0.15: R3.1@147.383,2.343 147.986,2.945 147.986,3.267 148.806,4.087 TP3.1@149.637,4.087 151.203,4.087 151.243,4.047
NetJ1_3: J1.3 R292.1 | length 4.4
  Bottom Layer w0.15: R292.1@147.623,3.387 149.553,5.317 151.243,5.317
NetJ1_7: J1.7 R293.1 | length 7.3
  Top Layer w0.15: v2(149.495,2.826) 149.495,2.847 152.881,6.234 v2(154.069,6.234)
  Bottom Layer w0.15: J1.7@152.907,6.587 153.68,6.587 154.033,6.234 v2(154.069,6.234)
NetJ1_9: J1.9 J1.10 R1.1 | length 9.6
  Bottom Layer w0.15: R1.1@147.394,1.256 150.617,1.256 151.475,0.397 152.859,0.397 153.381,0.92 153.381,2.119 153.102,2.398 153.102,2.41 153.012,2.5 J1.10@153,2.5 ; J1.10@152.907,2.777 J1.9@152.907,4.047
NetJ2_1: J2.1 R71.1 | length 3.2
  Top Layer w0.6: J2.1@173.85,1.015 174.055,1.22 174.055,2.038 R71.1@175.503,3.487
NetJ3_1: J3.1 R72.1 | length 6.1
  Top Layer w0.3: J3.1@10.895,18.1 11.25,17.745 11.25,17.574 11.695,17.129 15.258,17.129 15.905,17.776 16.01,17.776 16.135,17.901 R72.1@16.135,17.906
NetJ4_1: J4.1 R73.1 | length 7.1
  Top Layer w0.3: J4.1@36.776,1.015 37.131,1.37 37.131,1.518 37.598,1.986 40.374,1.986 41.451,3.063 41.451,4.224 41.421,4.255 41.421,4.405 R73.1@41.296,4.53
NetJ5_1: J5.1 R74.1 | length 1.9
  Bottom Layer w0.3: J5.1@23.533,1.015 R74.1@23.533,2.92
NetJ6_1: J6.1 R78.1 | length 1.9
  Bottom Layer w0.3: J6.1@25.74,18.048 25.792,18.048 26.095,17.745 26.095,17.693 26.887,16.901 R78.1@26.887,16.629
NetJ7_1: J7.1 R89.1 | length 7
  Layer 5 PWR w0.3: J7.1@52.847,18.048 53.15,17.745 53.15,17.693 54.636,16.207 54.636,12.217 54.383,11.965 v2(54.383,11.938)
NetL1_2: L1.2 R203.1 | length 1.9
  Bottom Layer w0.25: R203.1@161.449,15.973 161.451,15.973 161.731,16.254 162.686,16.254 162.9,16.04 L1.2@163.15,16.04
NetL1_3: L1.3 R202.1 | length 1.9
  Bottom Layer w0.25: R202.1@161.451,16.908 161.452,16.908 161.721,16.639 162.699,16.639 162.9,16.84 L1.3@163.15,16.84
NetL5_1: L5.1 U34.2 | length 2.1
  Top Layer w0.3: L5.1@166.054,8.895 166.067,8.908 166.959,8.908 ; 166.742,8.546 166.742,8.691 166.959,8.908 ; 166.742,9.125 166.959,8.908 ; U34.2@167.377,8.908 166.959,8.908
NetL6_1: L6.1 U37.7 | length 2.8
  Top Layer w0.3: U37.7@159.334,7.421 159.334,4.811 L6.1@159.481,4.663
NetQ1_4: Q1.4 R116.2 | length 5.7
  Top Layer w0.3: Q1.4@279.559,17.307 279.606,17.355 v1(279.702,17.355)
  Layer 2 GND w0.3: v1(279.702,17.355) 279.708,17.361 280.304,17.361 v1(280.31,17.367)
  Layer 9 GND w0.3: v1(279.702,17.355) 279.708,17.361 280.304,17.361 v1(280.31,17.367)
  Layer 5 PWR w0.3: v1(279.702,17.355) 279.708,17.361 280.304,17.361 v1(280.31,17.367)
  Layer 6 PWR w0.3: v1(279.702,17.355) 279.708,17.361 280.304,17.361 v1(280.31,17.367)
  Layer 4 GND w0.3: v1(279.702,17.355) 279.708,17.361 280.304,17.361 v1(280.31,17.367)
  Layer 7 GND w0.3: v1(279.702,17.355) 279.708,17.361 280.304,17.361 v1(280.31,17.367)
  Layer 3 SIG w0.3: v1(279.702,17.355) 279.708,17.361 280.304,17.361 v1(280.31,17.367)
  Layer 8 SIG w0.3: v1(279.702,17.355) 279.708,17.361 280.304,17.361 v1(280.31,17.367)
  Bottom Layer w0.3: v1(279.702,17.355) 279.708,17.361 280.304,17.361 v1(280.31,17.367)
NetQ2_4: Q2.4 R118.2 | length 2.3
  Bottom Layer w0.5: R118.2@270.849,16.999 270.849,17.038 271.318,17.507 Q2.4@272.877,17.507
NetQ3_4: Q3.4 R121.2 | length 8.1
  Top Layer w0.6: v1(279.726,11.244) 279.74,11.258 v1(280.333,11.258)
  Layer 2 GND w0.6: v1(279.726,11.244) 279.74,11.258 v1(280.333,11.258)
  Layer 9 GND w0.6: v1(279.726,11.244) 280.319,11.244 v1(280.333,11.258)
  Layer 5 PWR w0.6: v1(279.726,11.244) 280.319,11.244 v1(280.333,11.258)
  Layer 6 PWR w0.6: v1(279.726,11.244) 280.319,11.244 v1(280.333,11.258)
  Layer 4 GND w0.6: v1(279.726,11.244) 279.74,11.258 v1(280.333,11.258)
  Layer 7 GND w0.6: v1(279.726,11.244) 279.74,11.258 v1(280.333,11.258)
  Layer 3 SIG w0.6: v1(279.726,11.244) 279.74,11.258 v1(280.333,11.258)
  Layer 8 SIG w0.6: v1(279.726,11.244) 280.319,11.244 v1(280.333,11.258)
  Bottom Layer w0.6: v1(279.726,11.244) v1@279.74,11.258 ; v1@279.74,11.258 279.936,11.454 279.936,12.07 R121.2@279.996,12.13 280.056,12.07 280.056,11.535 v1(280.333,11.258) v1@279.74,11.258
NetQ4_4: Q4.4 R123.2 | length 2.5
  Bottom Layer w0.4: R123.2@270.522,10.955 270.522,11.01 270.682,11.17 270.737,11.17 270.804,11.237 Q4.4@272.877,11.237
NetQ5_4: Q5.4 R126.2 | length 8.2
  Top Layer w0.3: Q5.4@279.559,5.347 279.77,5.347 v1(279.824,5.293)
  Top Layer w0.6: v1(279.824,5.293) 279.836,5.281 v1(280.453,5.281)
  Layer 2 GND w0.6: v1(279.824,5.293) 280.441,5.293 v1(280.453,5.281)
  Layer 9 GND w0.6: v1(279.824,5.293) 280.441,5.293 v1(280.453,5.281)
  Layer 5 PWR w0.6: v1(279.824,5.293) 280.441,5.293 v1(280.453,5.281)
  Layer 6 PWR w0.6: v1(279.824,5.293) 280.441,5.293 v1(280.453,5.281)
  Layer 4 GND w0.6: v1(279.824,5.293) 280.441,5.293 v1(280.453,5.281)
  Layer 7 GND w0.6: v1(279.824,5.293) 280.441,5.293 v1(280.453,5.281)
  Layer 3 SIG w0.6: v1(279.824,5.293) 280.441,5.293 v1(280.453,5.281)
  Layer 8 SIG w0.6: v1(279.824,5.293) 280.441,5.293 v1(280.453,5.281)
  Bottom Layer w0.6: R126.2@280.06,5.982 R126.2@280.12,5.922 ; v1(280.453,5.281) 280.144,5.281 ; R126.2@280.12,5.922 280.055,5.922 280,5.867 280,5.469 v1(279.824,5.293) 279.836,5.281 280.144,5.281 ; R126.2@280.12,5.922 280.12,5.305 280.144,5.281
NetQ6_4: Q6.4 R128.2 | length 2.3
  Bottom Layer w0.2: R128.2@270.548,5.292 R128.2@270.592,5.336 ; Q6.4@272.814,5.336 Q6.4@272.858,5.381
  Bottom Layer w0.4: R128.2@270.592,5.336 Q6.4@272.814,5.336
NetQ8_4: Q8.4 R208.2 | length 1.5
  Top Layer w0.2: R208.2@256.141,15.401 256.146,15.401 256.263,15.285 Q8.4@256.263,13.933
NetR1_2: R1.2 U1.50 | length 3.8
  Top Layer w0.15: U1.50@143.011,1.812 143.011,1.849 143.08,1.918 144.911,1.918 145.573,1.256 v2(146.444,1.256)
NetR3_2: R3.2 U1.48 | length 5.6
  Top Layer w0.15: U1.48@142.011,1.812 142.011,2.387 142.649,3.025 143.284,3.025 143.812,2.497 145.334,2.497 145.489,2.343 146.473,2.343 v2(146.483,2.332)
NetR4_1: R4.1 U1.64 | length 1.8
  Top Layer w0.2: U1.64@144.736,10.037 144.755,10.018 145.756,10.018 146.29,9.485 R4.1@146.29,9.473
NetR6_2: R6.2 U31.2 | length 1.4
  Top Layer w0.4: U31.2@214.452,3.624 215.636,3.624 215.762,3.749 R6.2@215.767,3.749
NetR7_2: R7.2 U32.2 | length 1.4
  Top Layer w0.4: R7.2@226.972,12.161 226.972,12.156 227.165,11.962 U32.2@227.165,10.837
NetR8_2: R8.2 U33.2 | length 1.4
  Top Layer w0.4: U33.2@219.398,9.214 219.401,9.217 220.754,9.217 R8.2@220.757,9.22
NetR9_2: R9.2 U34.5 | length 1.4
  Top Layer w0.25: U34.5@168.927,8.908 168.952,8.883 169.462,8.883 170.09,8.256 R9.2@170.09,8.251
NetR11_1: R11.1 U2.A4 | length 1.2
  Top Layer w0.15: v2(85.77,5.64) 86.423,5.64 U2.A4@86.821,6.038
NetR12_1: R12.1 U2.D4 | length 0.7
  Top Layer w0.15: v2(89.341,6.587) 89.341,6.553 89.821,6.073 U2.D4@89.821,6.038
NetR13_1: R13.1 U2.C4 | length 0.7
  Top Layer w0.15: v2(88.341,6.537) 88.341,6.528 88.821,6.048 U2.C4@88.821,6.038
NetR15_1: R15.1 U3.A4 | length 1.2
  Top Layer w0.15: v2(85.821,14.037) 86.321,14.537 U3.A4@86.821,14.537
NetR16_1: R16.1 U3.D4 | length 0.8
  Top Layer w0.15: v2(89.321,15.087) 89.321,15.062 89.821,14.562 U3.D4@89.821,14.537
NetR17_1: R17.1 U3.C4 | length 0.8
  Top Layer w0.15: v2(88.321,15.087) 88.321,15.062 88.821,14.562 U3.C4@88.821,14.537
NetR18_2: R18.2 U2.B2 | length 0.7
  Top Layer w0.15: v2(87.375,3.497) 87.375,3.544 87.821,3.99 U2.B2@87.821,4.038
NetR19_2: R19.2 U3.B2 | length 1.9
  Top Layer w0.15: v2(86.129,11.917) 87.201,11.917 U3.B2@87.821,12.537
NetR20_2: R20.2 U2.D3 | length 0.7
  Top Layer w0.15: U2.D3@89.821,5.038 90.154,5.371 90.154,5.516 v2(90.202,5.564)
NetR21_2: R21.2 U3.D3 | length 0.8
  Top Layer w0.15: U3.D3@89.821,13.537 89.821,13.55 90.371,14.1 v2(90.371,14.112)
NetR22_2: R22.2 U2.D2 | length 0.7
  Top Layer w0.15: U2.D2@89.821,4.038 89.844,4.038 90.304,4.498 v2(90.327,4.498)
NetR23_2: R23.2 U3.D2 | length 0.8
  Top Layer w0.15: U3.D2@89.821,12.537 89.821,12.55 90.371,13.1 v2(90.371,13.112)
NetR25_1: R25.1 U4.A4 | length 1.2
  Top Layer w0.15: v2(75.821,5.587) 76.271,6.037 U4.A4@76.821,6.037
NetR26_1: R26.1 U4.D4 | length 0.7
  Top Layer w0.15: v2(79.321,6.537) U4.D4@79.821,6.037
NetR27_1: R27.1 U4.C4 | length 0.8
  Top Layer w0.15: v2(78.321,6.587) 78.321,6.562 78.821,6.062 U4.C4@78.821,6.037
NetR29_1: R29.1 U5.A4 | length 1.2
  Top Layer w0.15: v2(75.821,14.087) 76.271,14.537 U5.A4@76.821,14.537
NetR30_1: R30.1 U5.D4 | length 0.8
  Top Layer w0.15: v2(79.321,15.087) 79.321,15.062 79.821,14.562 U5.D4@79.821,14.537
NetR31_1: R31.1 U5.C4 | length 0.7
  Top Layer w0.15: v2(78.317,15.069) 78.317,15.056 78.821,14.551 U5.C4@78.821,14.537
NetR34_2: R34.2 U4.B2 | length 0.8
  Top Layer w0.15: v2(77.321,3.417) 77.369,3.465 77.369,3.585 U4.B2@77.821,4.037
NetR35_2: R35.2 U5.B2 | length 0.8
  Top Layer w0.15: v2(77.271,12.037) 77.296,12.037 77.796,12.537 U5.B2@77.821,12.537
NetR37_2: R37.2 U4.D3 | length 0.8
  Top Layer w0.15: U4.D3@79.821,5.037 79.821,5.042 80.371,5.592 v2(80.371,5.597)
NetR38_2: R38.2 U5.D3 | length 0.7
  Top Layer w0.15: U5.D3@79.821,13.537 v2(80.321,14.037)
NetR39_2: R39.2 U4.D2 | length 0.8
  Top Layer w0.15: U4.D2@79.821,4.037 79.821,4.042 80.371,4.592 v2(80.371,4.597)
NetR40_2: R40.2 U5.D2 | length 0.7
  Top Layer w0.15: U5.D2@79.821,12.537 80.029,12.745 80.08,12.745 80.323,12.987 v2(80.371,12.987)
NetR42_1: R42.1 U7.A4 | length 1.2
  Top Layer w0.15: v2(65.821,5.587) 66.271,6.037 U7.A4@66.821,6.037
NetR43_1: R43.1 U7.D4 | length 0.7
  Top Layer w0.15: v2(69.371,6.587) 69.371,6.536 69.821,6.086 U7.D4@69.821,6.037
NetR44_1: R44.1 U7.C4 | length 0.7
  Top Layer w0.15: v2(68.371,6.537) 68.371,6.512 68.821,6.062 U7.C4@68.821,6.037
NetR46_1: R46.1 U8.A4 | length 1.2
  Top Layer w0.15: v2(65.821,14.037) 66.321,14.537 U8.A4@66.821,14.537
NetR47_1: R47.1 U8.D4 | length 0.8
  Top Layer w0.15: v2(69.321,15.087) 69.321,15.062 69.821,14.562 U8.D4@69.821,14.537
NetR48_1: R48.1 U8.C4 | length 0.8
  Top Layer w0.15: v2(68.321,15.087) 68.321,15.062 68.821,14.562 U8.C4@68.821,14.537
NetR50_2: R50.2 U7.B2 | length 0.8
  Top Layer w0.15: v2(67.271,3.478) 67.271,3.483 67.821,4.033 U7.B2@67.821,4.037
NetR51_2: R51.2 U8.B2 | length 0.9
  Top Layer w0.15: v2(67.221,11.917) 67.221,11.927 67.821,12.527 U8.B2@67.821,12.537
NetR52_2: R52.2 U7.D3 | length 0.7
  Top Layer w0.15: U7.D3@69.821,5.037 v2(70.321,5.538)
NetR53_2: R53.2 U8.D3 | length 0.8
  Top Layer w0.15: U8.D3@69.821,13.537 v2(70.371,14.087)
NetR54_2: R54.2 U7.D2 | length 0.7
  Top Layer w0.15: U7.D2@69.821,4.037 69.861,4.037 70.332,4.508 v2(70.371,4.508)
NetR55_2: R55.2 U8.D2 | length 0.7
  Top Layer w0.15: U8.D2@69.821,12.537 69.87,12.537 70.32,12.987 v2(70.371,12.987)
NetR57_1: R57.1 U9.A4 | length 1.2
  Top Layer w0.15: v2(55.821,5.537) 56.321,6.037 U9.A4@56.821,6.037
NetR58_1: R58.1 U9.D4 | length 0.8
  Top Layer w0.15: v2(59.321,6.587) 59.321,6.562 59.821,6.062 U9.D4@59.821,6.037
NetR59_1: R59.1 U9.C4 | length 0.8
  Top Layer w0.15: v2(58.325,6.587) 58.325,6.56 58.821,6.065 U9.C4@58.821,6.037
NetR61_1: R61.1 U10.A4 | length 1.2
  Top Layer w0.15: v2(55.821,14.087) 56.271,14.537 U10.A4@56.821,14.537
NetR62_1: R62.1 U10.D4 | length 0.8
  Top Layer w0.15: v2(59.321,15.087) 59.321,15.062 59.821,14.562 U10.D4@59.821,14.537
NetR63_1: R63.1 U10.C4 | length 0.7
  Top Layer w0.15: v2(58.321,15.053) 58.321,15.046 58.821,14.545 U10.C4@58.821,14.537
NetR64_2: R64.2 U9.B2 | length 0.7
  Top Layer w0.15: v2(57.321,3.529) 57.321,3.533 57.821,4.033 U9.B2@57.821,4.037
NetR65_2: R65.2 U10.B2 | length 0.8
  Top Layer w0.15: v2(57.254,11.986) 57.262,11.986 57.813,12.537 U10.B2@57.821,12.537
NetR66_2: R66.2 U9.D3 | length 0.8
  Top Layer w0.15: U9.D3@59.821,5.037 59.821,5.072 60.321,5.572 v2(60.321,5.607)
NetR67_2: R67.2 U10.D3 | length 0.8
  Top Layer w0.15: U10.D3@59.821,13.537 60.274,13.99 60.409,13.99 v2(60.457,14.038)
NetR68_2: R68.2 U9.D2 | length 0.7
  Top Layer w0.15: U9.D2@59.821,4.037 60.282,4.498 v2(60.349,4.498)
NetR69_2: R69.2 U10.D2 | length 0.8
  Top Layer w0.15: U10.D2@59.831,12.547 60.217,12.933 60.45,12.933 v2(60.484,12.967)
NetR79_1: R79.1 U11.7 | length 3.4
  Top Layer w0.15: U11.7@100.511,5.172 100.514,5.17 101.786,5.17 v1(101.788,5.167)
  Bottom Layer w0.15: R79.1@99.784,5.545 101.411,5.545 v1(101.788,5.167)
NetR80_1: R80.1 U11.3 | length 3.4
  Top Layer w0.15: v2(93.921,3.842) 93.951,3.872 95.201,3.872 U11.3@95.231,3.902
  Bottom Layer w0.15: v2(93.921,3.842) 94.499,3.265 R80.1@95.745,3.265
NetR81_1: R81.1 R87.2 U11.2 | length 4.1
  Top Layer w0.15: v2(94,5.155) 94.009,5.164 U11.2@95.223,5.164 ; U11.2@95.501,5.144 U11.2@95.51,5.153
  Bottom Layer w0.15: v2(94,5.155) 94.122,5.155 94.394,5.426 R81.1@95.691,5.426 ; R87.2@95.707,4.36 95.708,4.361 R81.1@95.709,5.444 R81.1@95.709,5.444
NetR82_1: R82.1 R85.2 U11.6 | length 4.8
  Top Layer w0.15: U11.6@100.511,3.902 100.515,3.899 101.511,3.899 101.737,3.673 101.737,3.413 v1(101.823,3.327)
  Bottom Layer w0.15: R82.1@99.784,4.545 R85.2@99.784,3.545 99.853,3.477 101.223,3.477 101.298,3.402 101.748,3.402 v1(101.823,3.327)
NetR83_1: R83.1 R84.2 U11.1 | length 3.8
  Top Layer w0.15: v2(94,6.533) 94.045,6.488 U11.1@95.186,6.488 ; U11.1@95.464,6.468 U11.1@95.51,6.423
  Bottom Layer w0.15: v2(94,6.533) R83.1@95.535,6.533 ; R83.1@95.698,6.516 95.7,6.518 R84.2@95.7,7.518
NetR86_2: R86.2 R88.2 U11.5 | length 3.4
  Top Layer w0.15: U11.5@100.511,2.632 100.528,2.616 101.801,2.616 v1(101.818,2.6)
  Bottom Layer w0.15: R86.2@99.771,2.537 99.803,2.569 101.786,2.569 v1(101.818,2.6)
NetR90_1: R90.1 R92.2 U12.1 | length 2.8
  Top Layer w0.3: R92.2@157.73,16.309 R90.1@158.786,16.309 158.786,15.704 158.33,15.248 158.33,15.153 158.176,14.998 U12.1@157.974,14.998
NetR91_1: R91.1 R94.2 U12.4 | length 2.4
  Top Layer w0.3: U12.4@160.562,13.068 160.542,13.068 160.387,12.913 160.387,12.489 160.133,12.234 160.133,11.731 R91.1@160.129,11.728 160.251,11.605 R94.2@160.977,11.605
NetR92_1: R92.1 U1.87 | length 22.3
  Top Layer w0.15: v2(137.279,18.253) 137.326,18.206 137.326,18.062 137.511,17.878 U1.87@137.511,17.262 ; v2(145,17.55) 145.667,18.217 154.907,18.217 R92.1@156.822,16.301
  Layer 8 SIG w0.15: v2(137.279,18.253) 137.279,18.257 137.694,18.672 142.675,18.672 143.796,17.55 v2(145,17.55)
NetR93_2: R93.2 U12.3 | length 1.6
  Top Layer w0.3: R93.2@156.505,12.819 157.52,12.819 157.769,13.068 U12.3@157.974,13.068
NetR96_1: R96.1 R99.2 U13.5 | length 2.5
  Top Layer w0.4: U13.5@104.959,4.003 104.988,3.975 105.997,3.975 v2(106.005,3.966)
  Bottom Layer w0.4: R96.1@105.321,4.037 105.392,3.966 106.613,3.966 R99.2@106.684,4.037
NetR97_1: R97.1 R101.2 U13.6 | length 2.5
  Top Layer w0.4: U13.6@104.959,3.003 104.984,2.978 v2(106.006,2.978)
  Bottom Layer w0.4: R97.1@105.321,2.917 105.382,2.978 106.623,2.978 R101.2@106.684,2.917
NetR98_1: R98.1 R102.1 U13.7 | length 2.6
  Top Layer w0.3: v2(111.098,2.917) 111.141,2.96 112.028,2.96 U13.7@112.071,3.003
  Bottom Layer w0.3: R98.1@110.289,2.917 v2(111.098,2.917) ; v2@111.108,2.908 R102.1@111.919,2.908
NetR100_1: R100.1 R103.2 U13.8 | length 2.7
  Top Layer w0.3: v2(111.116,3.945) 111.145,3.974 112.042,3.974 U13.8@112.071,4.003
  Bottom Layer w0.3: R103.2@110.271,4.037 110.318,3.991 111.069,3.991 v2(111.116,3.945) ; v2@111.116,4.003 111.133,4.02 111.904,4.02 R100.1@111.921,4.037
NetR105_1: R105.1 R110.2 U14.7 | length 2.5
  Top Layer w0.15: U14.7@117.153,13.116 117.153,12.284 R105.1@117.653,11.785 R110.2@118.653,11.785
NetR106_1: R106.1 R109.2 U14.6 | length 2.3
  Top Layer w0.15: R109.2@115.653,11.785 R109.2@115.693,11.785 ; R109.2@115.698,11.789 R109.2@115.693,11.785 ; U14.6@116.653,13.116 R106.1@116.653,11.785 R109.2@115.693,11.785
NetR107_2: R107.2 U14.2 | length 1
  Top Layer w0.15: v2(114.742,15.056) 115.173,14.625 115.395,14.625 U14.2@115.485,14.535